# Altium PCB NewTrackerIRControl.PcbDoc (part 1 of 2)
Units mm, origin at the board's own origin, x right, y up, seen from the top; angles counter-clockwise.
Board outline 54 x 54 mm, 2 copper layers (Top Layer, Bottom Layer), stack 1.581 mm thick; 42 components, 15 nets, 94 pads, 126 vias.
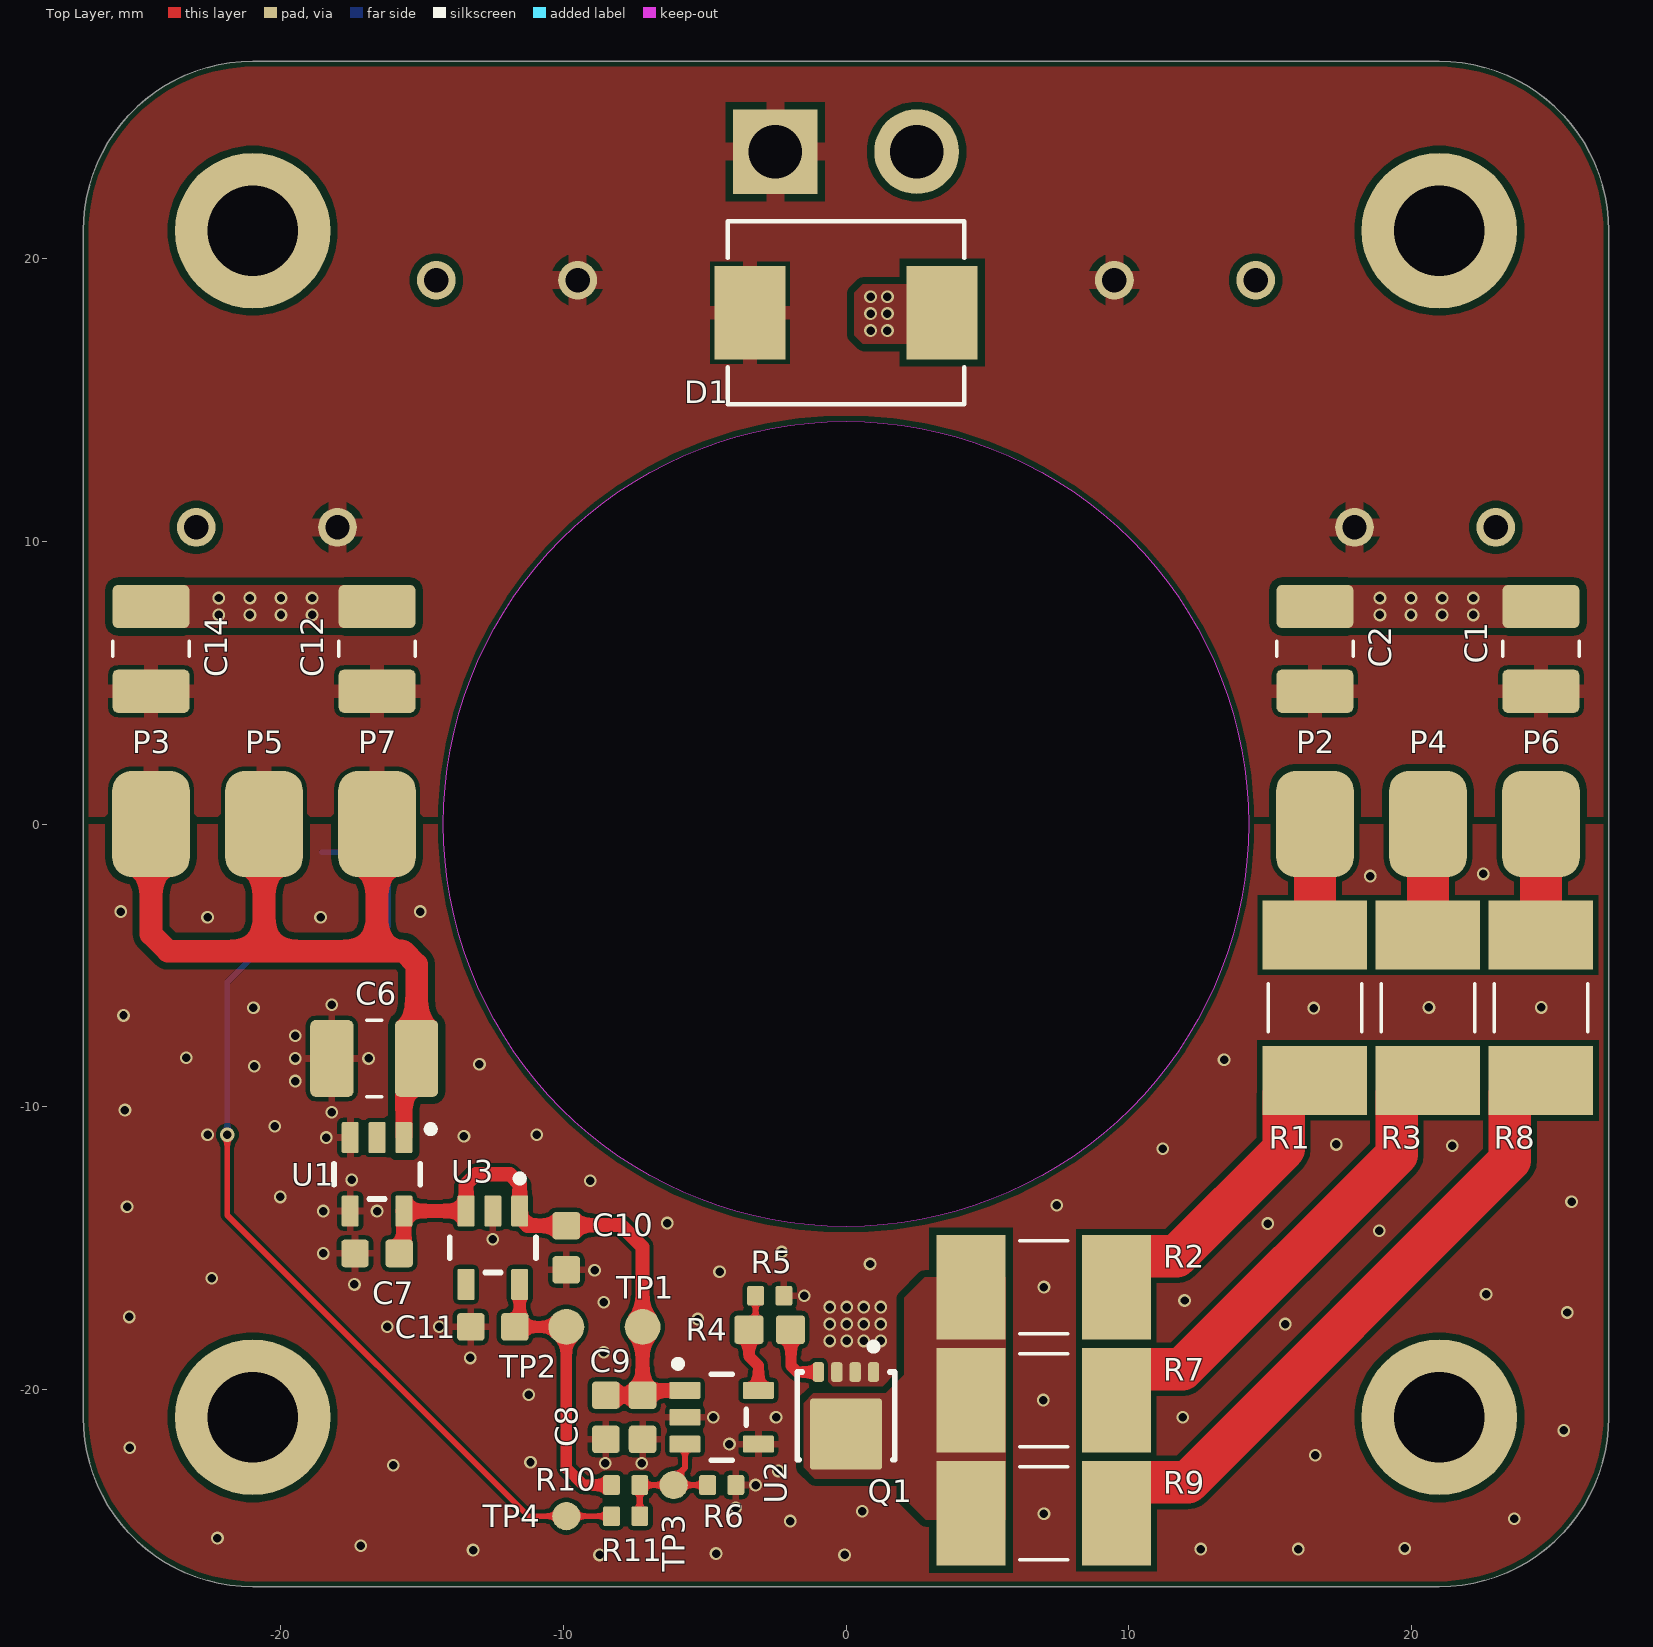
[diagram p0: Top Layer view]
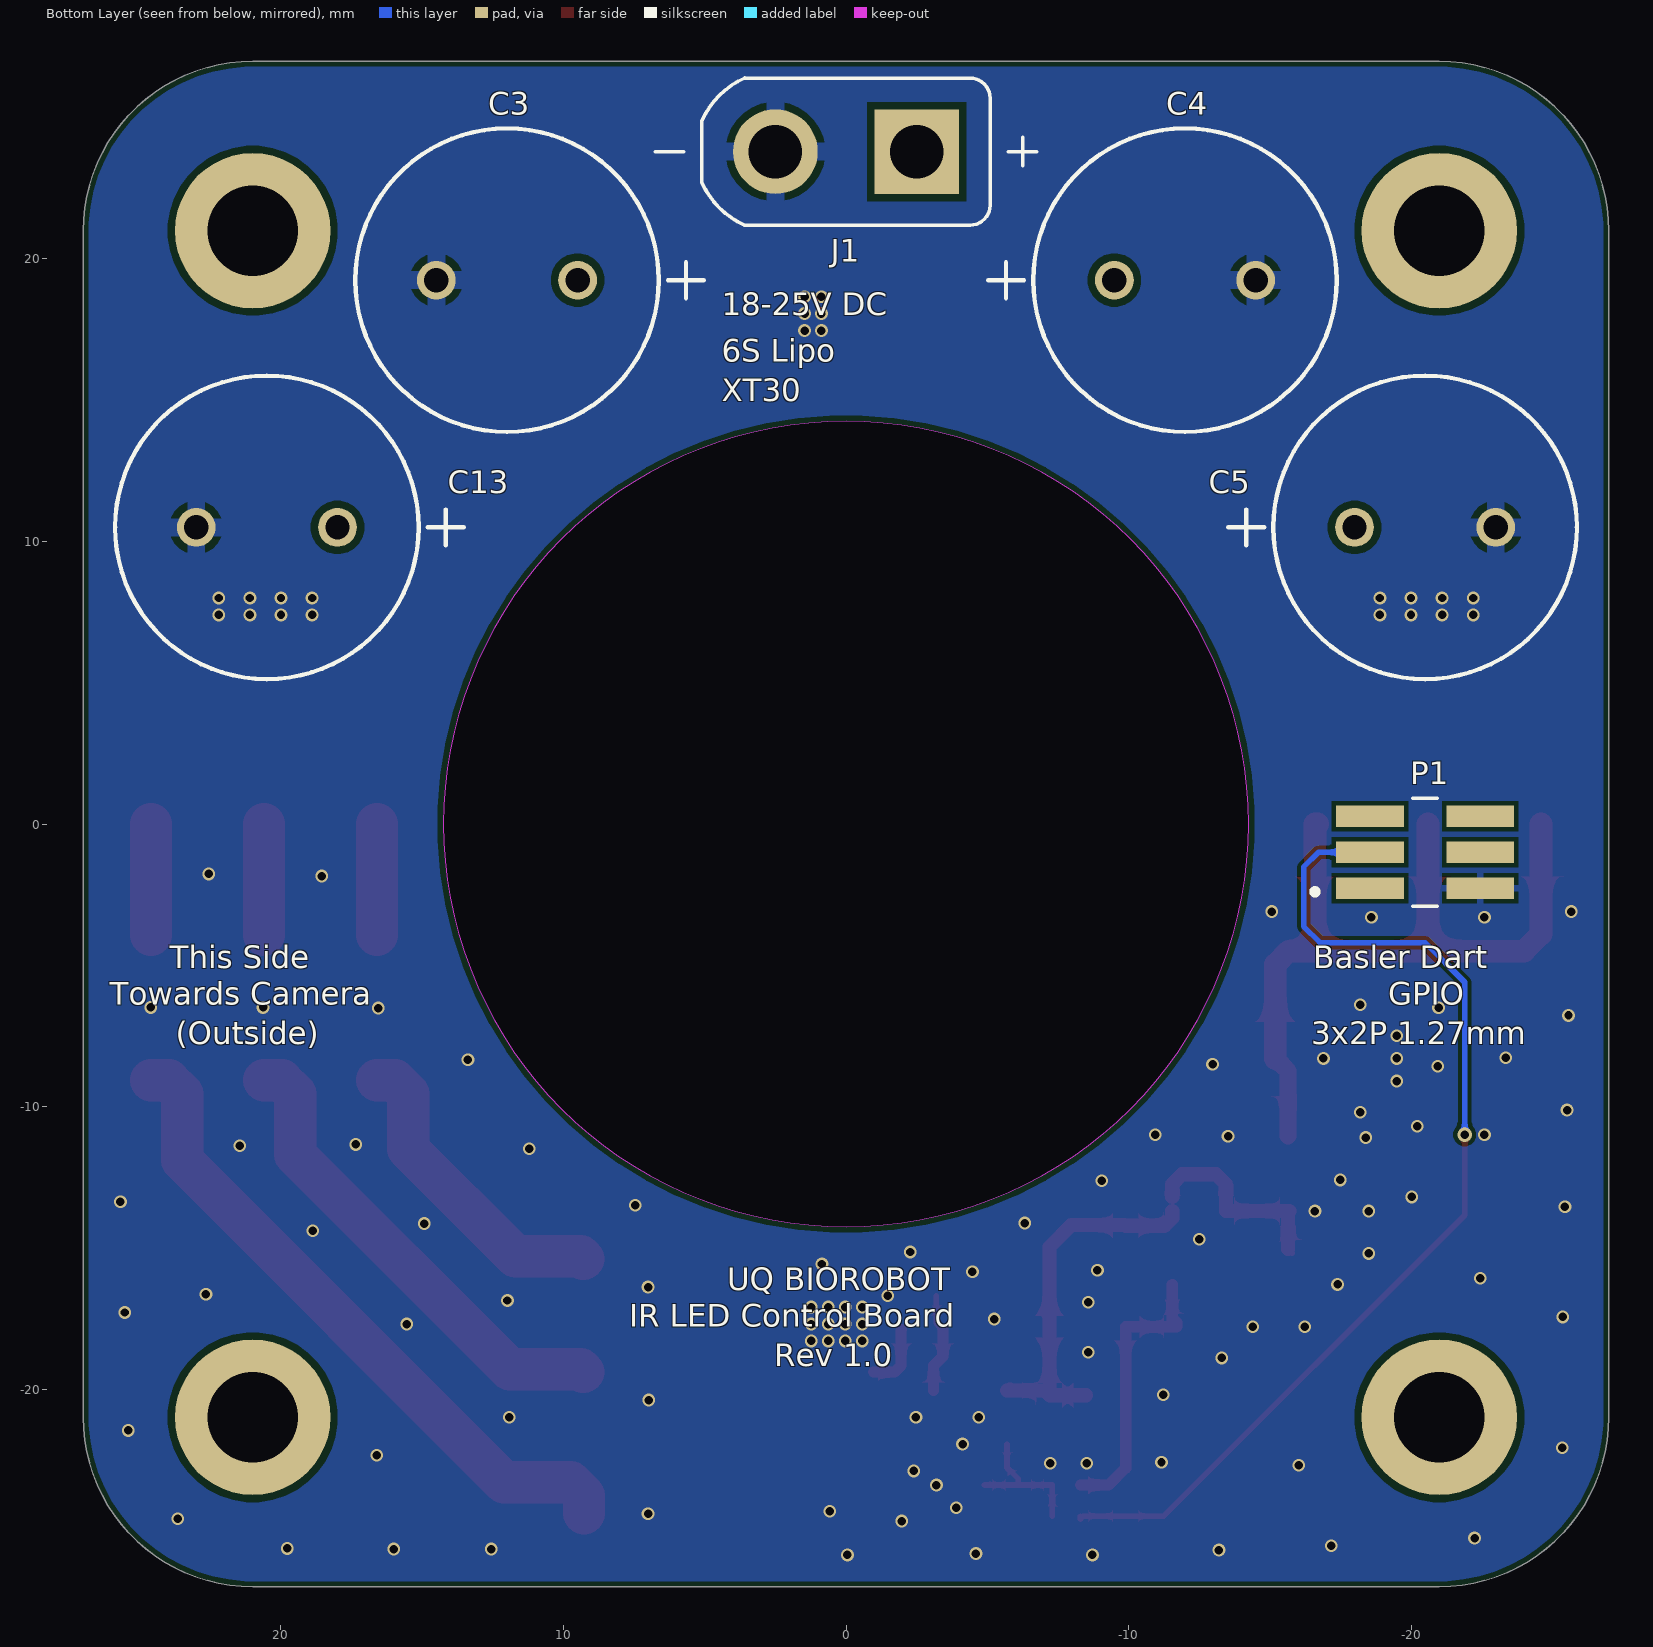
[diagram p1: Bottom Layer view, seen from below]
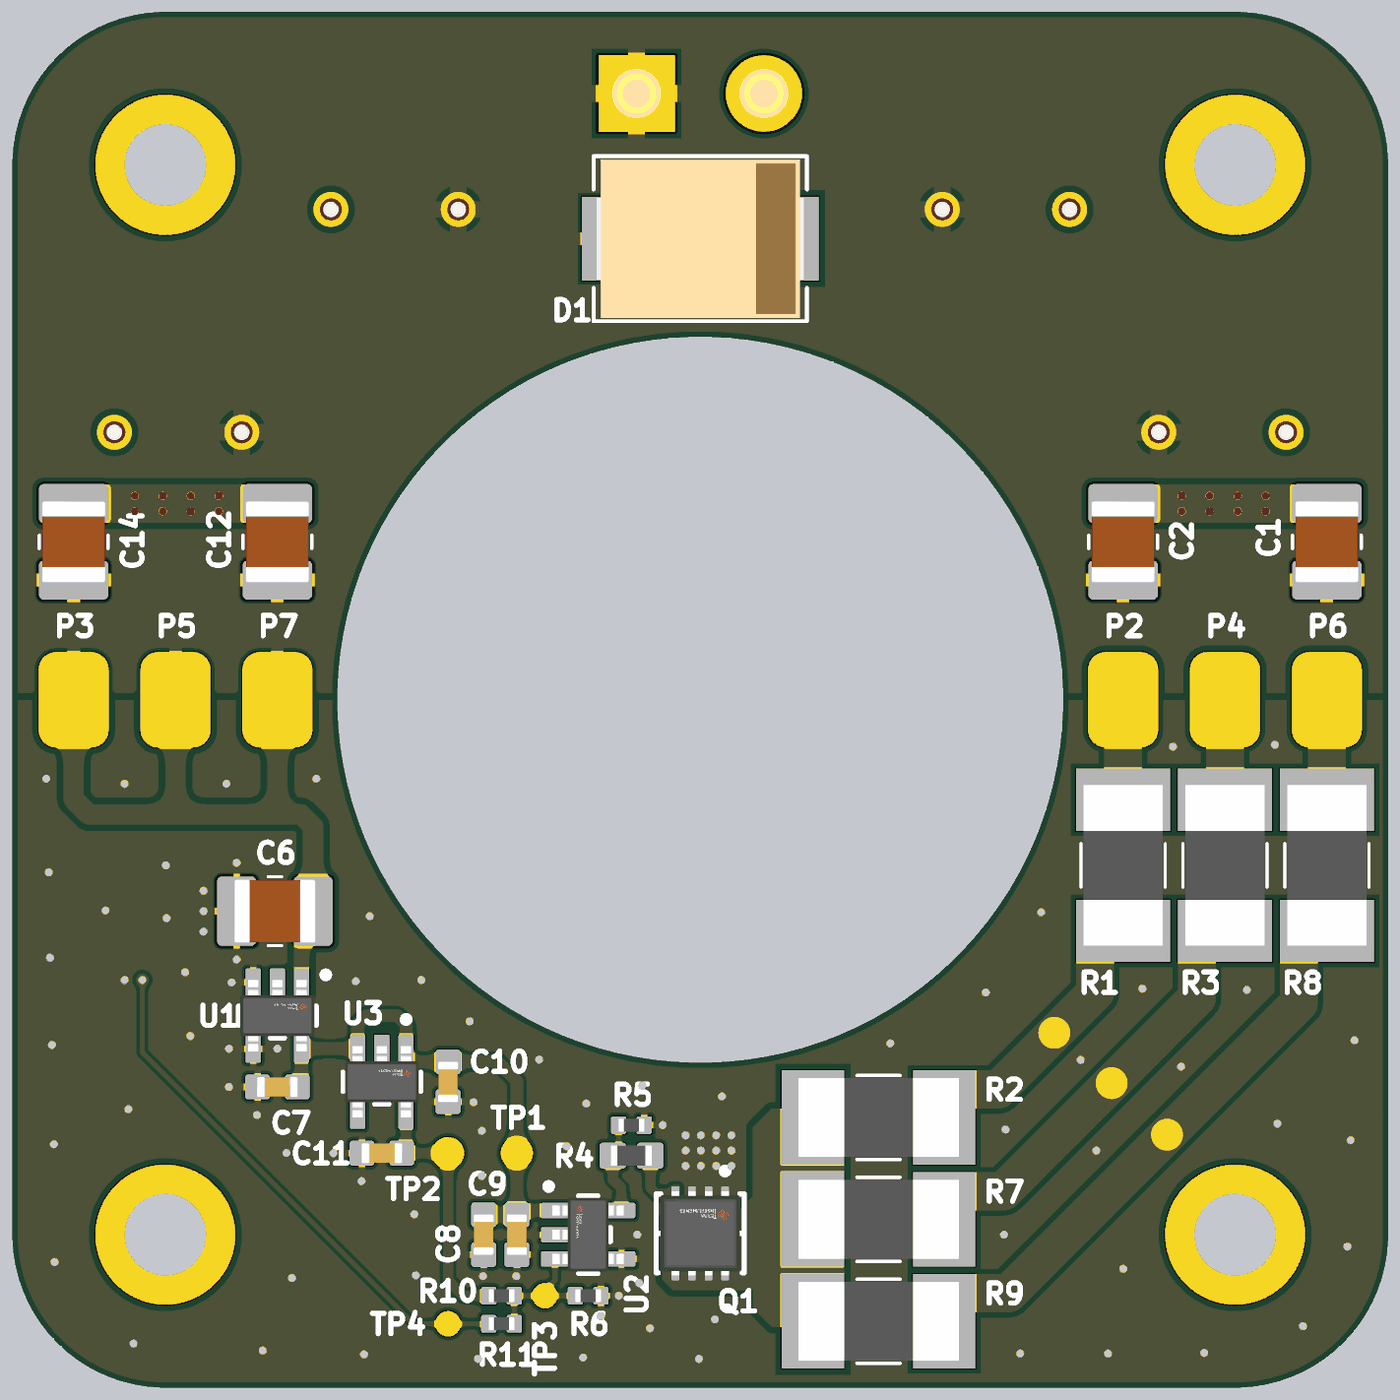
[diagram p2: 3D render of the assembled board from above, using the file's embedded part models]
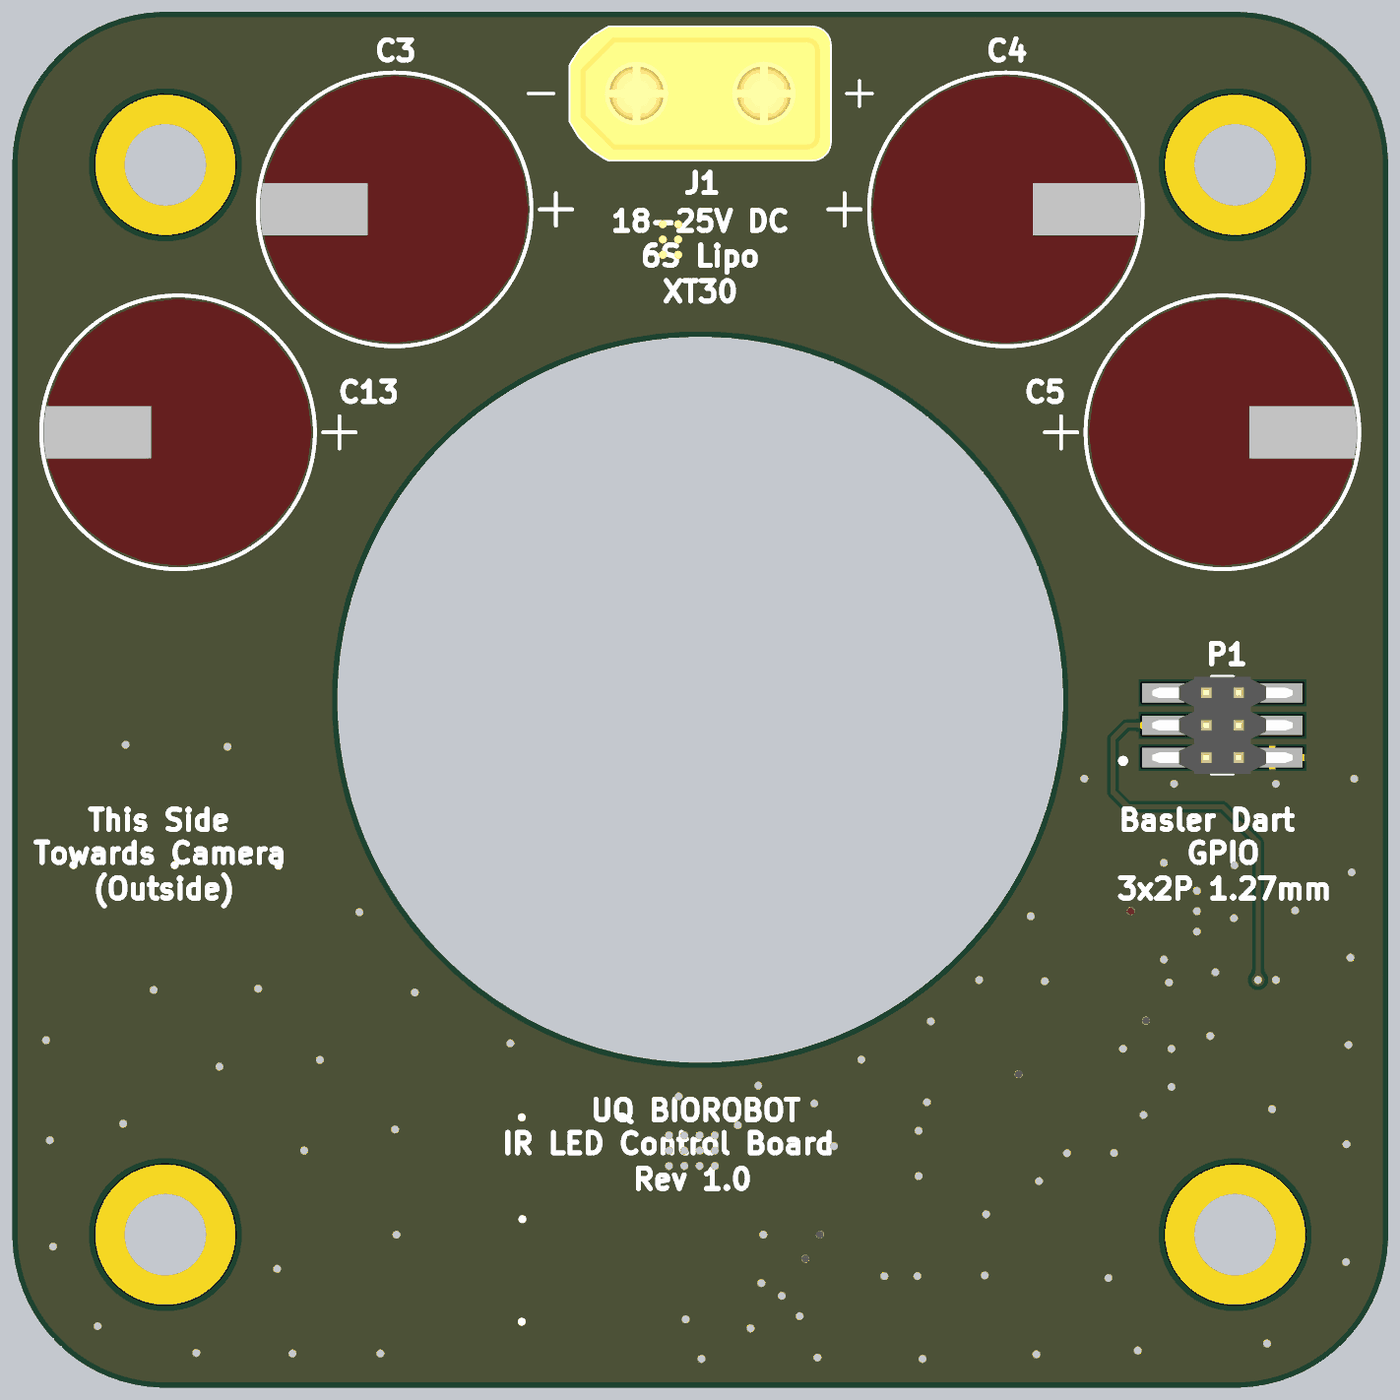
[diagram p3: 3D render of the assembled board from below, using the file's embedded part models]

## Layer stack, top to bottom
Top Solder: solder mask 0.0102, Solder Resist, Dk 3.5
Top Layer: signal copper 0.0356
Dielectric 1: dielectric 1.51, FR-4, Dk 4.8
Bottom Layer: signal copper 0.0356
Bottom Solder: solder mask 0.0102, Solder Resist, Dk 3.5

## Board outline
-27,-21 -27,21 cw(c-21,21) -21,27 21,27 cw(c21,21) 27,21 27,-21 cw(c21,-21) 21,-27 -21,-27 cw(c-21,-21)
cut-out: 0,-14.25 cw(c0,0) -14.25,0 cw(c0,0) 0,14.25 cw(c0,0) 14.25,0 cw(c0,0)

## Design rules (kind name [scope] priority, off if disabled: settings)
BoardOutlineClearance [All] p1: gap=0.2 ignorepadtopadclearanceinfootprint=FALSE
Clearance Clearance_7 [InNamedPolygon('TOPGND') vs (InNet('CHAINA') OR InNet('CHAINB') OR InNet('CHAINC') OR InNet('RES_A') OR InNet('RES_B') OR InNet('RES_C'))] p1: gap=0.254 ignorepadtopadclearanceinfootprint=FALSE except(0: Arc-Hole Track-Hole SMDPad-Hole THPad-Hole Via-Hole Fill-Hole Poly-Hole Region-Hole Text-Hole; 0.2: Arc-Fill Arc-Poly Arc-Region Track-Fill Track-Poly Track-Region SMDPad-Fill SMDPad-Poly SMDPad-Region THPad-Fill THPad-Poly THPad-Region Via-Fill Via-Poly Via-Region Fill-Fill Fill-Poly Fill-Region Poly-Poly Poly-Region Region-Region)
Clearance Clearance_6 [InNamedPolygon('14') vs (InNet('CHAINA') OR InNet('CHAINB') OR InNet('CHAINC'))] p2: gap=0.254 ignorepadtopadclearanceinfootprint=FALSE except(0: Arc-Hole Track-Hole SMDPad-Hole THPad-Hole Via-Hole Fill-Hole Poly-Hole Region-Hole Text-Hole)
Clearance Clearance_5 [InNamedPolygon('TOPGND') vs (InNet('DRAIN') OR InNet('+VBAT'))] p3: gap=0.254 ignorepadtopadclearanceinfootprint=FALSE except(0: Arc-Hole Track-Hole SMDPad-Hole THPad-Hole Via-Hole Fill-Hole Poly-Hole Region-Hole Text-Hole)
Clearance Clearance_4 [InNamedPolygon('TOPGND2')] p4: gap=0.254 ignorepadtopadclearanceinfootprint=FALSE except(0: Arc-Hole Track-Hole SMDPad-Hole THPad-Hole Via-Hole Fill-Hole Poly-Hole Region-Hole Text-Hole)
Clearance Clearance_3 [(InNamedPolygon('8') OR InNamedPolygon('9') OR InNamedPolygon('10') OR InNamedPolygon('11') OR InNamedPolygon('12') OR InNamedPolygon('13')) vs InNet('GND')] p5: gap=0.254 ignorepadtopadclearanceinfootprint=FALSE except(0: Arc-Hole Track-Hole SMDPad-Hole THPad-Hole Via-Hole Fill-Hole Poly-Hole Region-Hole Text-Hole)
Clearance Clearance_2 [InNamedPolygon('15') vs (InNet('+VBAT') or InNet('DRAIN'))] p6: gap=0.254 ignorepadtopadclearanceinfootprint=FALSE except(0: Arc-Hole Track-Hole SMDPad-Hole THPad-Hole Via-Hole Fill-Hole Poly-Hole Region-Hole Text-Hole)
Clearance Clearance_1 [InNamedPolygon('14') vs InNet('GND')] p7: gap=0.254 ignorepadtopadclearanceinfootprint=FALSE except(0: Arc-Hole Track-Hole SMDPad-Hole THPad-Hole Via-Hole Fill-Hole Poly-Hole Region-Hole Text-Hole)
Clearance [All] p8: gap=0.15 ignorepadtopadclearanceinfootprint=FALSE except(0.102: Arc-Text Track-Text SMDPad-Text THPad-Text Fill-Text Poly-Text Region-Text Text-Text; 0.12: Arc-Arc Arc-Track Track-Track; 0.127: Arc-Fill Arc-Poly Arc-Region Track-Fill Track-Poly Track-Region SMDPad-Via THPad-Via Via-Via Via-Fill Via-Poly Via-Region Via-Text; 0.2: Arc-THPad Track-THPad; 0.25: Arc-Hole Track-Hole SMDPad-Hole THPad-Fill THPad-Poly THPad-Region THPad-Hole Via-Hole Fill-Hole Poly-Hole Region-Hole Text-Hole)
DiffPairsRouting [InDifferentialPairClass('USBCONN_DIFF')] p1: maxlimit=0.127 minlimit=0.127 mostfreqgap=0.127 toplayer_minwidth=0.2 toplayer_maxwidth=0.2 toplayer_prefwidth=0.2 bottomlayer_minwidth=0.2 bottomlayer_maxwidth=0.2 bottomlayer_prefwidth=0.2 impedanceprofiledriven=TRUE maxuncoupledlength=12.7
HoleSize [All] p1: absolutevalues=TRUE maxlimit=6.3 minlimit=0.2 maxpercent=80.000 minpercent=20.000
HoleToHoleClearance [All] p1: gap=0.25 allowstackedmicrovias=FALSE
MinimumAnnularRing [All] p1: minimumring=0.074
MinimumSolderMaskSliver [All] p1: minsoldermaskwidth=0.1
PlaneClearance [All] p1: clearance=0.15
PolygonConnect PolygonConnect_16 [All vs IsNamedPolygon('TOPGND2')] p1: connectstyle=Direct reliefconductorwidth=0.254 reliefentries=4 polygonreliefangle="90 Angle" airgapwidth=0.254
PolygonConnect PolygonConnect_15 [All vs IsNamedPolygon('9')] p2: connectstyle=Direct reliefconductorwidth=0.254 reliefentries=4 polygonreliefangle="90 Angle" airgapwidth=0.254
PolygonConnect PolygonConnect_14 [All vs IsNamedPolygon('8')] p3: connectstyle=Direct reliefconductorwidth=0.254 reliefentries=4 polygonreliefangle="90 Angle" airgapwidth=0.254
PolygonConnect PolygonConnect_13 [All vs IsNamedPolygon('10')] p4: connectstyle=Direct reliefconductorwidth=0.254 reliefentries=4 polygonreliefangle="90 Angle" airgapwidth=0.254
PolygonConnect PolygonConnect_12 [All vs IsNamedPolygon('11')] p5: connectstyle=Direct reliefconductorwidth=0.254 reliefentries=4 polygonreliefangle="90 Angle" airgapwidth=0.254
PolygonConnect PolygonConnect_11 [All vs IsNamedPolygon('12')] p6: connectstyle=Direct reliefconductorwidth=0.254 reliefentries=4 polygonreliefangle="90 Angle" airgapwidth=0.254
PolygonConnect PolygonConnect_10 [All vs IsNamedPolygon('13')] p7: connectstyle=Direct reliefconductorwidth=0.254 reliefentries=4 polygonreliefangle="90 Angle" airgapwidth=0.254
PolygonConnect PolygonConnect_9 [All vs IsNamedPolygon('7')] p8: connectstyle=Direct reliefconductorwidth=0.254 reliefentries=4 polygonreliefangle="90 Angle" airgapwidth=0.254
PolygonConnect PolygonConnect_8 [All vs IsNamedPolygon('14')] p9: thpad.connectstyle=Relief thpad.reliefconductorwidth=0.65 thpad.reliefentries=4 thpad.polygonreliefangle="90 Angle" thpad.airgapwidth=0.254 smdpad.connectstyle=Relief smdpad.reliefconductorwidth=0.5 smdpad.reliefentries=4 smdpad.polygonreliefangle="90 Angle" smdpad.airgapwidth=0.154 via.connectstyle=Direct via.reliefconductorwidth=0.254 via.reliefentries=4 via.polygonreliefangle="90 Angle" via.airgapwidth=0.254
PolygonConnect PolygonConnect_1 [All vs IsNamedPolygon('TOPGND')] p10: thpad.connectstyle=Direct thpad.reliefconductorwidth=0.254 thpad.reliefentries=4 thpad.polygonreliefangle="90 Angle" thpad.airgapwidth=0.254 smdpad.connectstyle=Relief smdpad.reliefconductorwidth=0.254 smdpad.reliefentries=4 smdpad.polygonreliefangle="90 Angle" smdpad.airgapwidth=0.15 via.connectstyle=Direct via.reliefconductorwidth=0.254 via.reliefentries=4 via.polygonreliefangle="90 Angle" via.airgapwidth=0.254
PolygonConnect PolygonConnect_3 [All vs IsNamedPolygon('PADEE')] p11: connectstyle=Direct reliefconductorwidth=0.254 reliefentries=4 polygonreliefangle="90 Angle" airgapwidth=0.254
PolygonConnect PolygonConnect_7 [All vs IsNamedPolygon('4')] p12: connectstyle=Direct reliefconductorwidth=0.254 reliefentries=4 polygonreliefangle="90 Angle" airgapwidth=0.254
PolygonConnect PolygonConnect_6 [All vs IsNamedPolygon('3')] p13: connectstyle=Direct reliefconductorwidth=0.254 reliefentries=4 polygonreliefangle="90 Angle" airgapwidth=0.254
PolygonConnect PolygonConnect_5 [All vs IsNamedPolygon('2')] p14: connectstyle=Direct reliefconductorwidth=0.254 reliefentries=4 polygonreliefangle="90 Angle" airgapwidth=0.254
PolygonConnect PolygonConnect_4 [All vs IsNamedPolygon('1')] p15: connectstyle=Direct reliefconductorwidth=0.254 reliefentries=4 polygonreliefangle="90 Angle" airgapwidth=0.254
PolygonConnect [InNet('GND') vs InNamedPolygon('PADEE')] p16: connectstyle=Direct reliefconductorwidth=0.254 reliefentries=4 polygonreliefangle="90 Angle" airgapwidth=0.254
PolygonConnect PolygonConnect_2 [All] p17: thpad.connectstyle=Relief thpad.reliefconductorwidth=0.65 thpad.reliefentries=4 thpad.polygonreliefangle="90 Angle" thpad.airgapwidth=0.254 smdpad.connectstyle=Relief smdpad.reliefconductorwidth=0.254 smdpad.reliefentries=4 smdpad.polygonreliefangle="90 Angle" smdpad.airgapwidth=0.15 via.connectstyle=Direct via.reliefconductorwidth=0.254 via.reliefentries=4 via.polygonreliefangle="90 Angle" via.airgapwidth=0.254
RoutingVias [All] p1: holewidth=0.2 width=0.45 viastyle="Through Hole" minholewidth=0.2 minwidth=0.45 maxholewidth=0.2 maxwidth=0.45
SilkToSilkClearance [All] p1: silktosilkclearance=0
SilkToSolderMaskClearance [IsPad] p1: minsilkscreentomaskgap=0.102 clearancetoexposedcopper=TRUE
SolderMaskExpansion SolderMaskExpansion_1 [IsVia] p1: expansion=0.102 istentingtop=TRUE
SolderMaskExpansion [All] p2: expansion=0.075 istentingtop=FALSE
Width [All] p1: maxlimit=1.5 minlimit=0.102 preferedwidth=0.2 bottomlayer_maxwidth=0.8 minimp=50.000000 maximp=50.000000 favimp=50.000000
23 further rules are at their usual default settings.

## Components (designator, comment, footprint, x,y, rotation, side; value= is the part's Value field where it differs from the comment)
C1 "10uF" 1210_CAP 24.6,6.2 r270 top
C2 "10uF" 1210_CAP 16.6,6.2 r270 top
C3 "330uF" CAP_PKPZ_10X16_LOW_RUB 9.5,19.25 r0 bottom
C4 "330uF" CAP_PKPZ_10X16_LOW_RUB -9.5,19.25 r180 bottom
C5 "330uF" CAP_PKPZ_10X16_LOW_RUB -18,10.5 r180 bottom
C6 "10uF" 1210_CAP -16.7,-8.3 r0 top
C7 "10uF" 0603_CAP -16.6,-15.2 r0 top
C8 "10uF" 0603_CAP -8.5,-21 r90 top
C9 "100nF" 0603_CAP -7.2,-21 r90 top
C10 "1uF" 0603_CAP -9.9,-15 r90 top
C11 "2.2µF" 0603_CAP -12.5,-17.8 r0 top
C12 "10uF" 1210_CAP -16.6,6.2 r270 top
C13 "330uF" CAP_PKPZ_10X16_LOW_RUB 18,10.5 r0 bottom
C14 "10uF" 1210_CAP -24.6,6.2 r270 top
D1 "SMCJ26CA" SMCJSERIES_LTF-M 0,18.1 r180 top
J1 "XT30UPB-M" AMASS_XT30UPB-M 0,23.8 r0 bottom
P1 "6P 1.27mm Pitch Header" AMPHENOL_20021121-00006T4LF -20.5,-1 r270 bottom
P2 "3x2.5mm SOLDER_PAD" SOLDER_PAD_SMD 16.6,0 r0 top
P3 "3x2.5mm SMD_SOLDER_PAD" SOLDER_PAD_SMD -24.6,0 r180 top
P4 "3x2.5mm SOLDER_PAD" SOLDER_PAD_SMD 20.6,0 r0 top
P5 "3x2.5mm SMD_SOLDER_PAD" SOLDER_PAD_SMD -20.6,0 r180 top
P6 "3x2.5mm SOLDER_PAD" SOLDER_PAD_SMD 24.6,0 r0 top
P7 "3x2.5mm SMD_SOLDER_PAD" SOLDER_PAD_SMD -16.6,0 r180 top
Q1 "CSD18543Q3AT" FP-DNH0008A-MFG 0,-20.95 r270 top
R1 "1Ω" 2512_RES 16.6,-6.5 r270 top
R2 "0Ω" 2512_RES 7,-16.4 r0 top
R3 "1Ω" 2512_RES 20.6,-6.5 r270 top
R4 "10Ω" 0603_RES -2.7,-17.9 r0 top
R5 "10K" 0402_RES -2.7,-16.7 r180 top
R6 "100K" 0402_RES -4.4,-23.4 r180 top
R7 "0Ω" 2512_RES 7,-20.4 r0 top
R8 "1Ω" 2512_RES 24.6,-6.5 r270 top
R9 "0Ω" 2512_RES 7,-24.4 r0 top
R10 "0R" 0402_RES -7.8,-23.4 r0 top
R11 "0R" 0402_RES -7.8,-24.5 r0 top
TP1 "50mil TEST_PAD" 15mil_TEST_PAD -7.2,-17.8 r0 top
TP2 "50mil TEST_PAD" 15mil_TEST_PAD -9.9,-17.8 r0 top
TP3 "1mm TEST_PAD" 1mm_TEST_PAD -6.1,-23.4 r90 top
TP4 "1mm TEST_PAD" 1mm_TEST_PAD -9.9,-24.5 r90 top
U1 "TPS7B6950QDBVRQ1" FP-DBV0005A-MFG -16.6,-12.4 r270 top
U2 "UCC27517DBVR" FP-DBV0005A-MFG -4.4,-21 r0 top
U3 "TPS7A2033PDBVR" FP-DBV0005A-MFG -12.5,-15 r270 top

## Footprints (in the part's own frame and the unit in brackets; to place one, negate y for a bottom-side part, rotate by r counter-clockwise, add the part's x,y. Pads: shape width x height; smd on the part's side, far side on the other; paste and mask are expansions set on the pad)
1mm_TEST_PAD [mm]
  round 1 smd paste-2539.97 mask+0.051: 1(0,0)
15mil_TEST_PAD [mm]
  round 1.27 smd paste-2539.97 mask+0.051: 1(0,0)
0402_RES [mm]
  rrect25% 0.6x0.7 smd paste+0 mask+0.051: 1(-0.5,0) 2(0.5,0)
  body extent -0.5,-0.25 0.5,0.25, height 0.4
0603_CAP [mm]
  rrect25% 0.972x0.981 smd mask+0.051: 1(-0.78,0) 2(0.78,0)
  body extent -0.8,-0.4 0.8,0.4, height 0.9
0603_RES [mm]
  rrect25% 1.04x1.02 smd mask+0.051: 1(-0.735,0) 2(0.735,0)
  body extent -0.8,-0.4 0.8,0.4, height 0.55
1210_CAP [mm]
  rrect25% 1.53x2.72 smd paste+0 mask+0.102: 1(-1.5,0) 2(1.5,0)
  silkscreen extent -0.26,-1.35 0.26,1.35, body extent -1.6,-1.25 1.6,1.25, height 2.7
2512_RES [mm]
  rect 2.45x3.7 smd mask+0.051: 1(-2.575,0) 2(2.575,0)
  silkscreen extent -0.85,-1.65 0.85,1.65, body extent -3.15,-1.55 3.15,1.55, height 0.8
AMASS_XT30UPB-M [mm]
  rect 3x3 hole 1.9 mask+0.102: 1(-2.5,0)
  round 3 hole 1.9 mask+0.102: 2(2.5,0)
  silkscreen extent -6.75,-2.61 6.75,2.61, body extent -5.1,-2.6 5.1,2.6, height 10.7
AMPHENOL_20021121-00006T4LF [mm]
  rect 0.76x2.4 smd: 1(1.27,-1.95) 2(1.27,1.95) 3(0,-1.95) 4(0,1.95) 5(-1.27,-1.95) 6(-1.27,1.95)
  silkscreen extent -1.91,-4 1.91,0.43, body extent -1.91,-2.75 1.91,2.75, height 4.55
CAP_PKPZ_10X16_LOW_RUB [mil]
  round 54 hole 34 paste-27 mask+0: 1(0,0) 2(196.85,0)
  silkscreen extent -176,-212 310,212, body extent -108,-206 306,206, height 690
FP-DBV0005A-MFG [mm]
  rrect17% 1.1x0.6 smd paste+0 mask+0.051: 1(-1.3,0.95) 2(-1.3,0) 3(-1.3,-0.95) 4(1.3,-0.95) 5(1.3,0.95)
  silkscreen extent -1.72,-1.53 0.87,2.02, body extent -1.95,-1.78 1.95,1.78, height 0.25
FP-DNH0008A-MFG [mm]
  rrect50% 0.7x0.4 smd paste-1000 mask-1000: 1(-1.55,0.975) 2(-1.55,0.325) 3(-1.55,-0.325) 4(-1.55,-0.975)
  rrect8% 2.51x2.55 smd paste-1000 mask-1000: 5-6-7-8(0.645,0)
  silkscreen extent -2.57,-1.73 1.55,1.73, body extent -2,-1.88 2,1.88, height 0.25
SMCJSERIES_LTF-M [mm]
  rect 2.5x3.3 smd paste+0 mask+0.051: 1(-3.4,0) 2(3.4,0)
  silkscreen extent -4.19,-3.24 4.19,3.24, body extent -4.06,-3.11 4.06,3.11, height 2.67
SOLDER_PAD_SMD [mm]
  rrect50% 2.75x3.75 smd paste-100 mask+0.051: 1(0,0)

## Part data
C1 C2 C6 C12 C14: library part GCM32EC71H106KA03L, "50V 10uF X7S ±10% 1210 Multilayer Ceramic Capacitors MLCC - SMD/SMT ROHS", Capacitance=10µF, Case Code (Imperial)=1210, Case Code (Metric)=3225, Dielectric=X7S, Dielectric Material=Ceramic, Manufacturer=Murata, Manufacturer Lifecycle Status="IN PRODUCTION", Manufacturer Package Identifier="1210 (3225 Metric)", Max Operating Temperature=125°C, Min Operating Temperature=-55°C, Ratings=AEC-Q200, Supplier Part Number 1=490-14536-1-ND, Tolerance=±10%, Voltage Rating=50V, Case/Package=1210, Category="Ceramic Capacitors", ComponentLink1Description=https://datasheet.octopart.com:443/GCM32EC71H106KA03L-Murata-datasheet-96711494.pdf?src-supplier=element14+APAC, ComponentLink1URL=https://datasheet.octopart.com:443/GCM32EC71H106KA03L-Murata-datasheet-96711494.pdf?src-supplier=element14+APAC, ComponentLink2Description=https://datasheet.octopart.com:443/GCM32EC71H106KA03L-Murata-datasheet-141269272.pdf?src-supplier=Ciiva, ComponentLink2URL=https://datasheet.octopart.com:443/GCM32EC71H106KA03L-Murata-datasheet-141269272.pdf?src-supplier=Ciiva, ComponentLink3Description=https://datasheet.octopart.com:443/GCM32EC71H106KA03L-Murata-datasheet-140661459.pdf?src-supplier=Ciiva, ComponentLink3URL=https://datasheet.octopart.com:443/GCM32EC71H106KA03L-Murata-datasheet-140661459.pdf?src-supplier=Ciiva, ComponentLink4Description=https://datasheet.octopart.com:443/GCM32EC71H106KA03L-Murata-datasheet-138720471.pdf?src-supplier=Ciiva, ComponentLink4URL=https://datasheet.octopart.com:443/GCM32EC71H106KA03L-Murata-datasheet-138720471.pdf?src-supplier=Ciiva, ComponentLink5Description=https://datasheet.octopart.com:443/GCM32EC71H106KA03L-Murata-datasheet-12511495.pdf?src-supplier=TME, ComponentLink5URL=https://datasheet.octopart.com:443/GCM32EC71H106KA03L-Murata-datasheet-12511495.pdf?src-supplier=TME, ComponentLink6Description=http://sigma.octopart.com:80/reach_statement/Murata-company-16.pdf?src-supplier=Compliance+Statements, ComponentLink6URL=http://sigma.octopart.com:80/reach_statement/Murata-company-16.pdf?src-supplier=Compliance+Statements, Country of Origin="Japan, Philippines", Depth=2.5mm, Export Control Classification Number (ECCN) Code=EAR99, Harmonized Tariff Schedule (HTS) Code=8532.24.00.20, Height=2.5mm, Introduction Date=2013-11-20, Length=3.2mm, Lifecycle Status=Production, Manufacturer Part Number=GCM32EC71H106KA03L, Material=Ceramic, Mount="Surface Mount", Number of Terminals=2, Pricing 1="1=0.9, 10=0.569, 50=0.4396, 100=0.3997, 500=0.33218 (USD)", REACH SVHC=Yes, RoHS=Compliant, Schedule B="8532240020, 8532240020|8532240020, 8532240020|8532240020|8532240020, 8532240020|8532240020|8532240020|8532240020", Stock 1=65390, Supplier 1=DigiKey, Termination=SMD/SMT, Voltage Rating (DC)=50V, Weight=109.99615mg, Width=2.5mm
C3 C4 C5 C13: library part 50ZLJ330M10X16, "330uF 50V ±20% Plugin, D10xL16mm Aluminum Electrolytic Capacitors - Leaded ROHS", Capacitance=330µF, Case/Package=Radial, Leakage Current=165µA, Manufacturer=Rubycon, Max Operating Temperature=105°C, Min Operating Temperature=-40°C, Ripple Current=1.155A, Supplier Part Number 1=1189-50ZLJ330M10X16-ND, Tolerance=±20%, Voltage Rating (DC)=50V, Category="Aluminum Electrolytic Capacitors", ComponentLink1Description=https://datasheet.octopart.com:443/50ZLJ330M10X16-Rubycon-datasheet-182101256.pdf?src-supplier=IHS, ComponentLink1URL=https://datasheet.octopart.com:443/50ZLJ330M10X16-Rubycon-datasheet-182101256.pdf?src-supplier=IHS, Diameter=10mm, Length=16mm, Lifecycle Status=Production, Manufacturer Part Number=50ZLJ330M10X16, Mount="Through Hole", Number of Terminals=2, Packaging=Bulk, Pricing 1="1=0.92, 10=0.578, 50=0.4358, 100=0.3908, 500=0.31312, 1000=0.28861, 3000=0.25797, 5000=0.24651 (USD)", REACH SVHC=Yes, RoHS=Compliant, Stock 1=990, Supplier 1=DigiKey, Terminal Pitch=5mm
C7 C8: library part GRM188R61E106KA73J, "25V 10uF X7R ±10% 0603 Multilayer Ceramic Capacitors MLCC - SMD/SMT ROHS", Capacitance=10µF, Case/Package=0603, Dielectric=X5R, Dielectric Material=Ceramic, Manufacturer=Murata, Manufacturer Lifecycle Status="IN PRODUCTION", Max Operating Temperature=85°C, Min Operating Temperature=-55°C, Supplier Part Number 1=490-GRM188R61E106KA73JCT-ND, Tolerance=±10%, Voltage Rating=25V, Category="Ceramic Capacitors", ComponentLink1Description=https://datasheet.octopart.com:443/GRM188R61E106KA73J-Murata-datasheet-165579666.pdf?src-supplier=TME, ComponentLink1URL=https://datasheet.octopart.com:443/GRM188R61E106KA73J-Murata-datasheet-165579666.pdf?src-supplier=TME, ComponentLink2Description=https://datasheet.octopart.com:443/GRM188R61E106KA73J-Murata-datasheet-141274968.pdf?src-supplier=Ciiva, ComponentLink2URL=https://datasheet.octopart.com:443/GRM188R61E106KA73J-Murata-datasheet-141274968.pdf?src-supplier=Ciiva, ComponentLink3Description=https://datasheet.octopart.com:443/GRM188R61E106KA73J-Murata-datasheet-140704821.pdf?src-supplier=Ciiva, ComponentLink3URL=https://datasheet.octopart.com:443/GRM188R61E106KA73J-Murata-datasheet-140704821.pdf?src-supplier=Ciiva, ComponentLink4Description=https://datasheet.octopart.com:443/GRM188R61E106KA73J-Murata-datasheet-138742889.pdf?src-supplier=Ciiva, ComponentLink4URL=https://datasheet.octopart.com:443/GRM188R61E106KA73J-Murata-datasheet-138742889.pdf?src-supplier=Ciiva, ComponentLink5Description=https://datasheet.octopart.com/GRM188R61E106KA73J-Murata-datasheet-12515295.pdf, ComponentLink5URL=https://datasheet.octopart.com/GRM188R61E106KA73J-Murata-datasheet-12515295.pdf, ComponentLink6Description=https://datasheet.octopart.com/GRM188R61E106KA73J-Murata-datasheet-12510076.pdf, ComponentLink6URL=https://datasheet.octopart.com/GRM188R61E106KA73J-Murata-datasheet-12510076.pdf, ComponentLink7Description=https://datasheet.octopart.com/GRM188R61E106KA73J-Murata-datasheet-11978611.pdf, ComponentLink7URL=https://datasheet.octopart.com/GRM188R61E106KA73J-Murata-datasheet-11978611.pdf, ComponentLink8Description=https://datasheet.octopart.com/GRM188R61E106KA73J-Murata-datasheet-10025737.pdf, ComponentLink8URL=https://datasheet.octopart.com/GRM188R61E106KA73J-Murata-datasheet-10025737.pdf, ComponentLink9Description=https://datasheet.octopart.com/GRM188R61E106KA73J-Murata-datasheet-8819587.pdf, ComponentLink9URL=https://datasheet.octopart.com/GRM188R61E106KA73J-Murata-datasheet-8819587.pdf, ComponentLink10Description=http://sigma.octopart.com:80/reach_statement/Murata-company-16.pdf?src-supplier=Compliance+Statements, ComponentLink10URL=http://sigma.octopart.com:80/reach_statement/Murata-company-16.pdf?src-supplier=Compliance+Statements, Height=800µm, Length=1.6mm, Lifecycle Status=Production, Manufacturer Part Number=GRM188R61E106KA73J, Material=Ceramic, Mount="Surface Mount", Number of Terminals=2, Pricing 1="1=0.26, 10=0.149, 50=0.1072, 100=0.0945, 500=0.07304, 1000=0.06643, 2500=0.05947, 5000=0.05528 (USD)", REACH SVHC=Yes, RoHS=Compliant, Stock 1=170211, Supplier 1=DigiKey, Thickness=800µm, Voltage Rating (DC)=25V, Width=800µm
C9: library part GCJ188R71H104KA12D, "50V 100nF X7R ±10% 0603 Multilayer Ceramic Capacitors MLCC - SMD/SMT ROHS", Case Code (Imperial)=0603, Case Code (Metric)=1608, Dielectric=X7R, Dielectric Material=Ceramic, Manufacturer=Murata, Manufacturer Lifecycle Status="IN PRODUCTION", Max Operating Temperature=125°C, Min Operating Temperature=-55°C, Ratings=AEC-Q200, Supplier Part Number 1=490-5798-1-ND, Tolerance=±10%, Voltage Rating=50V, Capacitance=100nF, Case/Package=0603, Category="Ceramic Capacitors", ComponentLink1Description=https://datasheet.octopart.com:443/GCJ188R71H104KA12D-Murata-datasheet-68586835.pdf?src-supplier=Newark, ComponentLink1URL=https://datasheet.octopart.com:443/GCJ188R71H104KA12D-Murata-datasheet-68586835.pdf?src-supplier=Newark, ComponentLink2Description=https://datasheet.octopart.com:443/GCJ188R71H104KA12D-Murata-datasheet-140654765.pdf?src-supplier=Ciiva, ComponentLink2URL=https://datasheet.octopart.com:443/GCJ188R71H104KA12D-Murata-datasheet-140654765.pdf?src-supplier=Ciiva, ComponentLink3Description=https://datasheet.octopart.com:443/GCJ188R71H104KA12D-Murata-datasheet-138714437.pdf?src-supplier=Ciiva, ComponentLink3URL=https://datasheet.octopart.com:443/GCJ188R71H104KA12D-Murata-datasheet-138714437.pdf?src-supplier=Ciiva, ComponentLink4Description=https://datasheet.octopart.com:443/GCJ188R71H104KA12D-Murata-datasheet-165611796.pdf?src-supplier=TME, ComponentLink4URL=https://datasheet.octopart.com:443/GCJ188R71H104KA12D-Murata-datasheet-165611796.pdf?src-supplier=TME, ComponentLink5Description=https://datasheet.octopart.com:443/GCJ188R71H104KA12D-Murata-datasheet-12524712.pdf?src-supplier=Future+Electronics, ComponentLink5URL=https://datasheet.octopart.com:443/GCJ188R71H104KA12D-Murata-datasheet-12524712.pdf?src-supplier=Future+Electronics, ComponentLink6Description=https://datasheet.octopart.com/GCJ188R71H104KA12D-Murata-datasheet-14405607.pdf, ComponentLink6URL=https://datasheet.octopart.com/GCJ188R71H104KA12D-Murata-datasheet-14405607.pdf, ComponentLink7Description=http://sigma.octopart.com:80/reach_statement/Murata-company-16.pdf?src-supplier=Compliance+Statements, ComponentLink7URL=http://sigma.octopart.com:80/reach_statement/Murata-company-16.pdf?src-supplier=Compliance+Statements, Country of Origin="Japan, Philippines", Depth=800µm, Export Control Classification Number (ECCN) Code=EAR99, Features="Soft Termination", Harmonized Tariff Schedule (HTS) Code=8532.24.00.20, Height=800µm, Introduction Date=2012-05-07, Lead Free="Lead Free", Length=1.6mm, Lifecycle Status=Production, Manufacturer Part Number=GCJ188R71H104KA12D, Material=Ceramic, Mount="Surface Mount", Number of Terminals=2, Packaging="Cut Tape", Pricing 1="1=0.13, 10=0.073, 50=0.0508, 100=0.044, 500=0.0327, 1000=0.02922 (USD)", Radiation Hardening=No, REACH SVHC=Yes, RoHS=Compliant, Schedule B="8532240020, 8532240020|8532240020, 8532240020|8532240020|8532240020, 8532240020|8532240020|8532240020|8532240020", Stock 1=938408, Supplier 1=DigiKey, Termination=SMD/SMT, Voltage Rating (DC)=50V, Width=800µm
C10: library part GCM188R71E105KA64D, "25V 1uF X7R ±10% 0603 Multilayer Ceramic Capacitors MLCC - SMD/SMT ROHS", Capacitance=1µF, Case Code (Imperial)=0603, Case Code (Metric)=1608, Dielectric=X7R, Dielectric Material=Ceramic, Manufacturer=Murata, Manufacturer Lifecycle Status="IN PRODUCTION", Max Operating Temperature=125°C, Min Operating Temperature=-55°C, Ratings=AEC-Q200, Supplier Part Number 1=490-10673-1-ND, Tolerance=±10%, Voltage=25V, Case/Package=0603, Category="Ceramic Capacitors", ComponentLink1Description=https://datasheet.octopart.com:443/GCM188R71E105KA64D-Murata-datasheet-39128443.pdf?src-supplier=Newark, ComponentLink1URL=https://datasheet.octopart.com:443/GCM188R71E105KA64D-Murata-datasheet-39128443.pdf?src-supplier=Newark, ComponentLink2Description=https://datasheet.octopart.com:443/GCM188R71E105KA64D-Murata-datasheet-62316951.pdf?src-supplier=element14+APAC, ComponentLink2URL=https://datasheet.octopart.com:443/GCM188R71E105KA64D-Murata-datasheet-62316951.pdf?src-supplier=element14+APAC, ComponentLink3Description=https://datasheet.octopart.com:443/GCM188R71E105KA64D-Murata-datasheet-141267554.pdf?src-supplier=Geoflip, ComponentLink3URL=https://datasheet.octopart.com:443/GCM188R71E105KA64D-Murata-datasheet-141267554.pdf?src-supplier=Geoflip, ComponentLink4Description=https://datasheet.octopart.com:443/GCM188R71E105KA64D-Murata-datasheet-140658666.pdf?src-supplier=Ciiva, ComponentLink4URL=https://datasheet.octopart.com:443/GCM188R71E105KA64D-Murata-datasheet-140658666.pdf?src-supplier=Ciiva, ComponentLink5Description=https://datasheet.octopart.com:443/GCM188R71E105KA64D-Murata-datasheet-138718232.pdf?src-supplier=Ciiva, ComponentLink5URL=https://datasheet.octopart.com:443/GCM188R71E105KA64D-Murata-datasheet-138718232.pdf?src-supplier=Ciiva, ComponentLink6Description=https://datasheet.octopart.com:443/GCM188R71E105KA64D-Murata-datasheet-81455541.pdf?src-supplier=TME, ComponentLink6URL=https://datasheet.octopart.com:443/GCM188R71E105KA64D-Murata-datasheet-81455541.pdf?src-supplier=TME, ComponentLink7Description=https://datasheet.octopart.com/GCM188R71E105KA64D-Murata-datasheet-14404430.pdf, ComponentLink7URL=https://datasheet.octopart.com/GCM188R71E105KA64D-Murata-datasheet-14404430.pdf, ComponentLink8Description=https://datasheet.octopart.com:443/GCM188R71E105KA64D-Murata-datasheet-14393380.pdf?src-supplier=Future+Electronics, ComponentLink8URL=https://datasheet.octopart.com:443/GCM188R71E105KA64D-Murata-datasheet-14393380.pdf?src-supplier=Future+Electronics, ComponentLink9Description=https://datasheet.octopart.com:443/GCM188R71E105KA64D-Murata-datasheet-44103482.pdf?src-supplier=Future+Electronics, ComponentLink9URL=https://datasheet.octopart.com:443/GCM188R71E105KA64D-Murata-datasheet-44103482.pdf?src-supplier=Future+Electronics, ComponentLink10Description=http://sigma.octopart.com:80/reach_statement/Murata-company-16.pdf?src-supplier=Compliance+Statements, ComponentLink10URL=http://sigma.octopart.com:80/reach_statement/Murata-company-16.pdf?src-supplier=Compliance+Statements, Country of Origin=Philippines, Depth=800µm, Export Control Classification Number (ECCN) Code=EAR99, Harmonized Tariff Schedule (HTS) Code=8532.24.00.20, Height=800µm, Introduction Date=2010-10-29, Lead Free="Lead Free", Length=1.6mm, Lifecycle Status=Production, Manufacturer Part Number=GCM188R71E105KA64D, Material=Ceramic, Mount="Surface Mount", Number of Terminals=2, Packaging="Cut Tape", Pricing 1="1=0.19, 10=0.106, 50=0.0752, 100=0.0658, 500=0.04994, 1000=0.04504 (USD)", Radiation Hardening=No, REACH SVHC=Yes, RoHS=Compliant, Schedule B="8532240020, 8532240020|8532240020, 8532240020|8532240020|8532240020, 8532240020|8532240020|8532240020|8532240020", Stock 1=751115, Supplier 1=DigiKey, Termination=SMD/SMT, Voltage Rating=25V, Voltage Rating (DC)=25V, Weight=6.293594mg, Width=800µm
C11: library part GRM188Z71E225KE43D, "25V 2.2uF X7R ±10% 0603 Multilayer Ceramic Capacitors MLCC - SMD/SMT ROHS", Case/Package=0603, Dielectric Material=X7R, Manufacturer=Murata, Manufacturer Lifecycle Status="IN PRODUCTION", Max Operating Temperature=125°C, Min Operating Temperature=-55°C, Supplier Part Number 1=490-GRM188Z71E225KE43DCT-ND, Tolerance=±10%, Voltage Rating=25V, Capacitance=2.2µF, Category="Ceramic Capacitors", ComponentLink1Description=https://datasheet.octopart.com:443/GRM188Z71E225KE43D-Murata-datasheet-141276026.pdf?src-supplier=Geoflip, ComponentLink1URL=https://datasheet.octopart.com:443/GRM188Z71E225KE43D-Murata-datasheet-141276026.pdf?src-supplier=Geoflip, ComponentLink2Description=https://datasheet.octopart.com:443/GRM188Z71E225KE43D-Murata-datasheet-165579666.pdf?src-supplier=TME, ComponentLink2URL=https://datasheet.octopart.com:443/GRM188Z71E225KE43D-Murata-datasheet-165579666.pdf?src-supplier=TME, ComponentLink3Description=https://datasheet.octopart.com:443/GRM188Z71E225KE43D-Murata-datasheet-140705919.pdf?src-supplier=Ciiva, ComponentLink3URL=https://datasheet.octopart.com:443/GRM188Z71E225KE43D-Murata-datasheet-140705919.pdf?src-supplier=Ciiva, ComponentLink4Description=https://datasheet.octopart.com:443/GRM188Z71E225KE43D-Murata-datasheet-138743437.pdf?src-supplier=Ciiva, ComponentLink4URL=https://datasheet.octopart.com:443/GRM188Z71E225KE43D-Murata-datasheet-138743437.pdf?src-supplier=Ciiva, ComponentLink5Description=http://sigma.octopart.com:80/reach_statement/Murata-company-16.pdf?src-supplier=Compliance+Statements, ComponentLink5URL=http://sigma.octopart.com:80/reach_statement/Murata-company-16.pdf?src-supplier=Compliance+Statements, Export Control Classification Number (ECCN) Code=EAR99, Harmonized Tariff Schedule (HTS) Code=8532.24.00.20, Height=800µm, Introduction Date=2017-02-21, Length=1.6mm, Lifecycle Status=Production, Manufacturer Part Number=GRM188Z71E225KE43D, Material=Ceramic, Mount="Surface Mount", Number of Terminals=2, Pricing 1="1=0.17, 10=0.096, 50=0.068, 100=0.0593, 500=0.04474, 1000=0.04026 (USD)", REACH SVHC=Yes, RoHS=Compliant, Stock 1=149124, Supplier 1=DigiKey, Thickness=800µm, Voltage Rating (DC)=25V, Width=800µm
D1: "SMCJ Series 42.1 V 1.5 kW Surface Mount Bi-Directional TVS Diode - DO-214AB", Breakdown Voltage=30.4V, Clamping Voltage=42.1V, Leakage Current=1µA, Manufacturer=Littelfuse, Max Breakdown Voltage=31.9V, Max Operating Temperature=150°C, Max Power Dissipation=6.5W, Max Surge Current=35.7A, Min Breakdown Voltage=28.9V, Min Operating Temperature=-65°C, Operating Supply Voltage=26V, Peak Pulse Power=1.5kW, Power Line Protection=No, Supplier Part Number 1=SMCJ26CALFCT-ND, Test Current=1mA, Category="TVS Diodes", China RoHS=Non-Compliant, ComponentLink1Description=https://datasheet.octopart.com:443/SMCJ26CA-Littelfuse-datasheet-150463582.pdf?src-supplier=Newark, ComponentLink1URL=https://datasheet.octopart.com:443/SMCJ26CA-Littelfuse-datasheet-150463582.pdf?src-supplier=Newark, ComponentLink2Description=https://datasheet.octopart.com:443/SMCJ26CA-Littelfuse-datasheet-65933527.pdf?src-supplier=element14+APAC, ComponentLink2URL=https://datasheet.octopart.com:443/SMCJ26CA-Littelfuse-datasheet-65933527.pdf?src-supplier=element14+APAC, ComponentLink3Description=https://datasheet.octopart.com:443/SMCJ26CA-Littelfuse-datasheet-10669596.pdf?src-supplier=Farnell, ComponentLink3URL=https://datasheet.octopart.com:443/SMCJ26CA-Littelfuse-datasheet-10669596.pdf?src-supplier=Farnell, ComponentLink4Description=https://datasheet.octopart.com:443/SMCJ26CA-Littelfuse-datasheet-8450502.pdf?src-supplier=Farnell, ComponentLink4URL=https://datasheet.octopart.com:443/SMCJ26CA-Littelfuse-datasheet-8450502.pdf?src-supplier=Farnell, ComponentLink5Description=https://datasheet.octopart.com:443/SMCJ26CA-Littelfuse-datasheet-5314397.pdf?src-supplier=Farnell, ComponentLink5URL=https://datasheet.octopart.com:443/SMCJ26CA-Littelfuse-datasheet-5314397.pdf?src-supplier=Farnell, ComponentLink6Description=https://datasheet.octopart.com:443/SMCJ26CA-Littelfuse-datasheet-530249.pdf?src-supplier=Farnell, ComponentLink6URL=https://datasheet.octopart.com:443/SMCJ26CA-Littelfuse-datasheet-530249.pdf?src-supplier=Farnell, ComponentLink7Description=https://datasheet.octopart.com:443/SMCJ26CA-Littelfuse-datasheet-24577164.pdf?src-supplier=Fuses+Unlimited, ComponentLink7URL=https://datasheet.octopart.com:443/SMCJ26CA-Littelfuse-datasheet-24577164.pdf?src-supplier=Fuses+Unlimited, ComponentLink8Description=https://datasheet.octopart.com:443/SMCJ26CA-Littelfuse-datasheet-1147.pdf?src-supplier=DigiKey, ComponentLink8URL=https://datasheet.octopart.com:443/SMCJ26CA-Littelfuse-datasheet-1147.pdf?src-supplier=DigiKey, Composition=Zener, Country of Origin="Mainland China, Philippines", Direction=Bidirectional, Export Control Classification Number (ECCN) Code=EAR99, Harmonized Tariff Schedule (HTS) Code=8541.10.00.50, Height=2.62mm, Introduction Date=2003-11-20, Lead Free="Lead Free", Length=8.13mm, Lifecycle Status=Production, Manufacturer Part Number=SMCJ26CA, Max Reverse Leakage Current=1µA, Mount="Surface Mount", Number of Bidirectional Channels=1, Number of Channels=1, Number of Elements=1, Number of Pins=2, Number of Terminals=2, Packaging="Cut Tape", Peak Pulse Current=35.7A, Peak Reverse Current=1µA, Polarity=Bidirectional, Power Dissipation=1.5kW, Power Rating=1.5kW, Pricing 1="1=0.97, 10=0.603, 100=0.3916, 500=0.30046, 1000=0.27108 (USD)", Radiation Hardening=No, REACH SVHC=No, Reverse Breakdown Voltage=28.9V, Reverse Standoff Voltage=26V, Reverse Voltage=26V, RoHS=Compliant, Schedule B="8541100080, 8541100080|8541100080|8541100080|8541100080|8541100080", Stock 1=33241, Supplier 1=DigiKey, Termination=SMD/SMT, Voltage Rating (DC)=26V, Width=6.22mm
J1: "Socket; DC supply; XT30; male; PIN: 2; on PCBs; THT; Colour: yellow", Package=None, Check_prices=https://www.snapeda.com/parts/XT30PW-M/AMASS/view-part/?ref=eda, MF=AMASS, MP=XT30UPB-M, SnapEDA_Link=https://www.snapeda.com/parts/XT30PW-M/AMASS/view-part/?ref=snap
P1: library part 20021121-00006C4LF, "Pin Header, Vertical, Board-to-Board, 1.27 mm, 2 Rows, 6 Contacts, Surface Mount Straight", Color=Black, Contact Resistance=30mΩ, Current Rating=1A, Dielectric Material=Polyethylene, Insulation Resistance=100MΩ, Manufacturer="Amphenol Communications Solutions", Max Operating Temperature=105°C, Max Voltage Rating (AC)=125V, Min Operating Temperature=-40°C, Operating Force=2.1406N, Supplier Part Number 1=609-3693-1-ND, Category="Headers and Wire Housings", China RoHS=Compliant, ComponentLink1Description=https://datasheet.octopart.com:443/20021121-00006C4LF-Amphenol-Communications-Solutions-datasheet-102830508.pdf?src-supplier=Electro+Sonic, ComponentLink1URL=https://datasheet.octopart.com:443/20021121-00006C4LF-Amphenol-Communications-Solutions-datasheet-102830508.pdf?src-supplier=Electro+Sonic, ComponentLink2Description=https://datasheet.octopart.com:443/20021121-00006C4LF-Amphenol-Communications-Solutions-datasheet-21379658.pdf?src-supplier=Farnell, ComponentLink2URL=https://datasheet.octopart.com:443/20021121-00006C4LF-Amphenol-Communications-Solutions-datasheet-21379658.pdf?src-supplier=Farnell, ComponentLink3Description=https://datasheet.octopart.com:443/20021121-00006C4LF-Amphenol-Communications-Solutions-datasheet-62305862.pdf?src-supplier=Farnell, ComponentLink3URL=https://datasheet.octopart.com:443/20021121-00006C4LF-Amphenol-Communications-Solutions-datasheet-62305862.pdf?src-supplier=Farnell, ComponentLink4Description=https://datasheet.octopart.com:443/20021121-00006C4LF-FCI-datasheet-17852665.pdf?src-supplier=Farnell, ComponentLink4URL=https://datasheet.octopart.com:443/20021121-00006C4LF-FCI-datasheet-17852665.pdf?src-supplier=Farnell, ComponentLink5Description=https://datasheet.octopart.com:443/20021121-00006C4LF-Amphenol-Communications-Solutions-datasheet-98396828.pdf?src-supplier=element14+APAC, ComponentLink5URL=https://datasheet.octopart.com:443/20021121-00006C4LF-Amphenol-Communications-Solutions-datasheet-98396828.pdf?src-supplier=element14+APAC, ComponentLink6Description=https://datasheet.octopart.com:443/20021121-00006C4LF-FCI-datasheet-8699946.pdf?src-supplier=element14+APAC, ComponentLink6URL=https://datasheet.octopart.com:443/20021121-00006C4LF-FCI-datasheet-8699946.pdf?src-supplier=element14+APAC, ComponentLink7Description=https://datasheet.octopart.com:443/20021121-00006C4LF-FCI-datasheet-8640585.pdf?src-supplier=element14+APAC, ComponentLink7URL=https://datasheet.octopart.com:443/20021121-00006C4LF-FCI-datasheet-8640585.pdf?src-supplier=element14+APAC, ComponentLink8Description=https://datasheet.octopart.com:443/20021121-00006C4LF-FCI-datasheet-13726100.pdf?src-supplier=_legacy+Avnet, ComponentLink8URL=https://datasheet.octopart.com:443/20021121-00006C4LF-FCI-datasheet-13726100.pdf?src-supplier=_legacy+Avnet, ComponentLink9Description=https://datasheet.octopart.com:443/20021121-00006C4LF-FCI-datasheet-11547764.pdf?src-supplier=Arrow+Electronics, ComponentLink9URL=https://datasheet.octopart.com:443/20021121-00006C4LF-FCI-datasheet-11547764.pdf?src-supplier=Arrow+Electronics, Connector Type="Header, Male Pin", Contact Material=Gold, Contact Mating Length=3.048mm, Contact Plating=Gold, Depth=3.4mm, Export Control Classification Number (ECCN) Code=EAR99, Gender=Male, Harmonized Tariff Schedule (HTS) Code=8536.69.40.40, Height=5.05mm, Housing Color=Black, Housing Material=Thermoplastic, Insulation Color=Black, Introduction Date=2010-01-29, Length=3.81mm, Lifecycle Status=Production, Manufacturer Part Number=20021121-00006C4LF, Mating Post Length=3.05mm, Mount="Surface Mount", Number of Contacts=6, Number of Pins=6, Number of Positions=6, Number of Rows=2, Orientation=Straight, Pitch=1.27mm, Plating Thickness=254nm, Pricing 1="1=0.64, 10=0.544, 100=0.4618 (USD)", Radiation Hardening=No, REACH SVHC=Yes, RoHS=Compliant, Row Spacing=3.9116mm, Stack Height=3mm, Stock 1=95236, Supplier 1=DigiKey, Terminal Pitch=1.27mm, Termination=Solder, Voltage Rating=125V
P2 P4 P6: library part "3x2.5mm SMD_SOLDER_PAD", "Plated SMD 3x2.5mm SOLDER_PAD"
P3 P5 P7: "Plated SMD 3x2.5mm SOLDER_PAD"
Q1: "60-V, N channel NexFET™ power MOSFET, single SON 3 mm x 3 mm, 9.9 mOhm 8-VSONP -55 to 150", Continuous Drain Current (ID)=12A, Drain to Source Breakdown Voltage=60V, Drain to Source Resistance=8.1mΩ, Gate to Source Voltage (Vgs)=20V, Manufacturer="Texas Instruments", Manufacturer Lifecycle Status=ACTIVE, Max Junction Temperature (Tj)=150°C, Min Operating Temperature=-55°C, Power Dissipation=2.8W, Supplier Part Number 1=296-45302-1-ND, Category=MOSFETs, ComponentLink1Description=https://sigma.octopart.com:443/184372195/technical_drawing/Texas-Instruments-CSD18543Q3AT.pdf?src-supplier=Texas+Instruments, ComponentLink1URL=https://sigma.octopart.com:443/184372195/technical_drawing/Texas-Instruments-CSD18543Q3AT.pdf?src-supplier=Texas+Instruments, ComponentLink2Description=https://octopart.com:443/opatz8j6/c1?t=SsZgKvRmmw05RbnxMb6edfQyltnbhyNkxL9f19K7YcDX2j1foEMjoZPIc1l6vPtWCior1K7MK4Ecl1cKgo7MV1fVyam4EaqiB1Wt0OcocW5rsSx2yHOKWqXc7qV_A0CR85SjtUmhgxtnEX_hM021VMdHmrWiCD7BUQ-eFjN1wT7d3uOjDZQ6HjTgQKaKXek5tndBDP7-u4o-8p4DuqFUS4zP_5tfnTJWQnkrrbk4pzubypwZn_kVBqW1ULvAfegc6D8FFE5u7LfzGe8qoWlBn9GcTR49XIZj8i8BnCmCBkJ1P3eljVqSMcggCW9mefLwr27y7eoW1Wo15o2SxNy6lW0bRjf9UomrOlGTID-rE5uK6cy_FeSS_Sykc-I3kUdFVxsB4BxBI3g&src-supplier=Texas+Instruments, ComponentLink2URL=https://octopart.com:443/opatz8j6/c1?t=SsZgKvRmmw05RbnxMb6edfQyltnbhyNkxL9f19K7YcDX2j1foEMjoZPIc1l6vPtWCior1K7MK4Ecl1cKgo7MV1fVyam4EaqiB1Wt0OcocW5rsSx2yHOKWqXc7qV_A0CR85SjtUmhgxtnEX_hM021VMdHmrWiCD7BUQ-eFjN1wT7d3uOjDZQ6HjTgQKaKXek5tndBDP7-u4o-8p4DuqFUS4zP_5tfnTJWQnkrrbk4pzubypwZn_kVBqW1ULvAfegc6D8FFE5u7LfzGe8qoWlBn9GcTR49XIZj8i8BnCmCBkJ1P3eljVqSMcggCW9mefLwr27y7eoW1Wo15o2SxNy6lW0bRjf9UomrOlGTID-rE5uK6cy_FeSS_Sykc-I3kUdFVxsB4BxBI3g&src-supplier=Texas+Instruments, ComponentLink3Description=https://sigma.octopart.com:443/181443430/technical_drawing/Texas-Instruments-CSD18543Q3AT.pdf?src-supplier=Texas+Instruments, ComponentLink3URL=https://sigma.octopart.com:443/181443430/technical_drawing/Texas-Instruments-CSD18543Q3AT.pdf?src-supplier=Texas+Instruments, ComponentLink4Description=https://datasheet.octopart.com:443/CSD18543Q3AT-Texas-Instruments-datasheet-73765672.pdf?src-supplier=Upverter, ComponentLink4URL=https://datasheet.octopart.com:443/CSD18543Q3AT-Texas-Instruments-datasheet-73765672.pdf?src-supplier=Upverter, ComponentLink5Description=https://datasheet.octopart.com:443/CSD18543Q3AT-Texas-Instruments-datasheet-160724818.pdf?src-supplier=Augswan, ComponentLink5URL=https://datasheet.octopart.com:443/CSD18543Q3AT-Texas-Instruments-datasheet-160724818.pdf?src-supplier=Augswan, ComponentLink6Description=http://sigma.octopart.com:80/reach_statement/Texas-Instruments-company-64.pdf?src-supplier=Compliance+Statements, ComponentLink6URL=http://sigma.octopart.com:80/reach_statement/Texas-Instruments-company-64.pdf?src-supplier=Compliance+Statements, ComponentLink7Description=http://sigma.octopart.com:80/conflict_mineral_statement/Texas-Instruments-company-63.pdf?src-supplier=Compliance+Statements, ComponentLink7URL=http://sigma.octopart.com:80/conflict_mineral_statement/Texas-Instruments-company-63.pdf?src-supplier=Compliance+Statements, Drain to Source Voltage (Vdss)=60V, Element Configuration=Single, Height=900µm, Length=3.3mm, Lifecycle Status=Production, Manufacturer Part Number=CSD18543Q3AT, Max Operating Temperature=150°C, Number of Channels=1, Number of Pins=8, Pricing 1="1=2.29, 10=1.462, 100=0.9912 (USD)", RoHS=Compliant, Schedule B="8541290080, 8541290080|8541290080, 8541290080|8541290080|8541290080|8541290080|8541290080", Stock 1=4526, Supplier 1=DigiKey, Thickness=800µm, Turn-Off Delay Time=8ns, Turn-On Delay Time=9ns, Width=3.3mm
R1 R3 R8: library part CRM2512-JW-1R0ELF, "2W Thick Film Resistors ±200ppm/℃ ±5% 1Ω 2512 Chip Resistor - Surface Mount ROHS", Case Code (Imperial)=2512, Case Code (Metric)=6432, Manufacturer=Bourns, Max Operating Temperature=155°C, Max Power Dissipation=2W, Min Operating Temperature=-55°C, Supplier Part Number 1=CRM2512-JW-1R0ELFCT-ND, Temperature Coefficient=200ppm/°C, Tolerance=±5%, Voltage Rating=600V, Working Voltage=300V, Case/Package=2512, Category="Chip SMD Resistors", China RoHS=Non-Compliant, ComponentLink1Description=https://datasheet.octopart.com:443/CRM2512-JW-1R0ELF-Bourns-datasheet-170520297.pdf?src-supplier=IHS, ComponentLink1URL=https://datasheet.octopart.com:443/CRM2512-JW-1R0ELF-Bourns-datasheet-170520297.pdf?src-supplier=IHS, ComponentLink2Description=https://datasheet.octopart.com:443/CRM2512-JW-1R0ELF-Bourns-datasheet-47549200.pdf?src-supplier=Burklin+Elektronik, ComponentLink2URL=https://datasheet.octopart.com:443/CRM2512-JW-1R0ELF-Bourns-datasheet-47549200.pdf?src-supplier=Burklin+Elektronik, ComponentLink3Description=https://datasheet.octopart.com:443/CRM2512-JW-1R0ELF-Bourns-datasheet-164353756.pdf?src-supplier=JRH+Electronics, ComponentLink3URL=https://datasheet.octopart.com:443/CRM2512-JW-1R0ELF-Bourns-datasheet-164353756.pdf?src-supplier=JRH+Electronics, ComponentLink4Description=https://datasheet.octopart.com:443/CRM2512-JW-1R0ELF-Bourns-datasheet-156155912.pdf?src-supplier=Newark, ComponentLink4URL=https://datasheet.octopart.com:443/CRM2512-JW-1R0ELF-Bourns-datasheet-156155912.pdf?src-supplier=Newark, ComponentLink5Description=https://datasheet.octopart.com:443/CRM2512-JW-1R0ELF-Bourns-datasheet-10028171.pdf?src-supplier=Newark, ComponentLink5URL=https://datasheet.octopart.com:443/CRM2512-JW-1R0ELF-Bourns-datasheet-10028171.pdf?src-supplier=Newark, ComponentLink6Description=https://datasheet.octopart.com:443/CRM2512-JW-1R0ELF-Bourns-datasheet-14874567.pdf?src-supplier=RS+(Formerly+Allied+Electronics), ComponentLink6URL=https://datasheet.octopart.com:443/CRM2512-JW-1R0ELF-Bourns-datasheet-14874567.pdf?src-supplier=RS+(Formerly+Allied+Electronics), ComponentLink7Description=https://datasheet.octopart.com:443/CRM2512-JW-1R0ELF-Bourns-datasheet-154729672.pdf?src-supplier=Electro+Sonic, ComponentLink7URL=https://datasheet.octopart.com:443/CRM2512-JW-1R0ELF-Bourns-datasheet-154729672.pdf?src-supplier=Electro+Sonic, ComponentLink8Description=https://datasheet.octopart.com:443/CRM2512-JW-1R0ELF-Bourns-datasheet-182141858.pdf?src-supplier=Master+Electronics, ComponentLink8URL=https://datasheet.octopart.com:443/CRM2512-JW-1R0ELF-Bourns-datasheet-182141858.pdf?src-supplier=Master+Electronics, ComponentLink9Description=https://datasheet.octopart.com:443/CRM2512-JW-1R0ELF-Bourns-datasheet-10186184.pdf?src-supplier=element14, ComponentLink9URL=https://datasheet.octopart.com:443/CRM2512-JW-1R0ELF-Bourns-datasheet-10186184.pdf?src-supplier=element14, ComponentLink10Description=https://datasheet.octopart.com:443/CRM2512-JW-1R0ELF-Bourns-datasheet-8556829.pdf?src-supplier=element14, ComponentLink10URL=https://datasheet.octopart.com:443/CRM2512-JW-1R0ELF-Bourns-datasheet-8556829.pdf?src-supplier=element14, ComponentLink11Description=http://sigma.octopart.com:80/conflict_mineral_statement/Bourns-company-36.pdf?src-supplier=Compliance+Statements, ComponentLink11URL=http://sigma.octopart.com:80/conflict_mineral_statement/Bourns-company-36.pdf?src-supplier=Compliance+Statements, Composition="Thick Film", Contact Plating=Tin, Country of Origin=Taiwan, Depth=3.1mm, Export Control Classification Number (ECCN) Code=EAR99, Harmonized Tariff Schedule (HTS) Code=8533.21.00.30, Height=600µm, Introduction Date=2011-02-17, Length=6.3mm, Lifecycle Status=Production, Manufacturer Part Number=CRM2512-JW-1R0ELF, Military Standard=Not, Mount="Surface Mount", Number of Pins=2, Number of Terminals=2, Number of Terminations=2, Packaging="Cut Tape", Power Rating=2W, Pricing 1="1=0.45, 10=0.287, 25=0.2428, 50=0.2156, 100=0.1922, 250=0.1666, 500=0.1506, 1000=0.13697 (USD)", REACH SVHC=Yes, Resistance=1Ω, RoHS=Compliant, Schedule B="8533210045, 8533210045|8533210045, 8533210045|8533210045|8533210045, 8533210045|8533210045|8533210045|8533210045", Stock 1=57195, Supplier 1=DigiKey, Termination=SMD/SMT, Voltage Rating (DC)=600V, Width=3.1mm
R2 R7 R9: library part CR2512-J/-000ELF, "0Ω RES SMD 0 OHM JUMPER 1W 2512 / 0 Ohms Jumper 1W Chip Resistor 2512 (6432 Metric) Thick Film", Case Code (Imperial)=2512, Case Code (Metric)=6332, Manufacturer=Bourns, Max Operating Temperature=155°C, Max Power Dissipation=1W, Min Operating Temperature=-55°C, Supplier Part Number 1=CR2512-J/-000ELFCT-ND, Temperature Coefficient=500ppm/°C, Tolerance=±5%, Voltage Rating=200V, Case/Package=2512, Category="Chip SMD Resistors", China RoHS=Non-Compliant, ComponentLink1Description=https://datasheet.octopart.com:443/CR2512-J--000ELF-Bourns-datasheet-159578630.pdf?src-supplier=IHS, ComponentLink1URL=https://datasheet.octopart.com:443/CR2512-J--000ELF-Bourns-datasheet-159578630.pdf?src-supplier=IHS, ComponentLink2Description=https://datasheet.octopart.com:443/CR2512-J--000ELF-Bourns-datasheet-159777434.pdf?src-supplier=IHS, ComponentLink2URL=https://datasheet.octopart.com:443/CR2512-J--000ELF-Bourns-datasheet-159777434.pdf?src-supplier=IHS, ComponentLink3Description=https://datasheet.octopart.com:443/CR2512-J--000ELF-Bourns-datasheet-38188400.pdf?src-supplier=element14+APAC, ComponentLink3URL=https://datasheet.octopart.com:443/CR2512-J--000ELF-Bourns-datasheet-38188400.pdf?src-supplier=element14+APAC, ComponentLink4Description=https://datasheet.octopart.com:443/CR2512-J--000ELF-Bourns-datasheet-68301993.pdf?src-supplier=Master+Electronics, ComponentLink4URL=https://datasheet.octopart.com:443/CR2512-J--000ELF-Bourns-datasheet-68301993.pdf?src-supplier=Master+Electronics, ComponentLink5Description=https://datasheet.octopart.com:443/CR2512-J--000ELF-Bourns-datasheet-177039333.pdf?src-supplier=Burklin+Elektronik, ComponentLink5URL=https://datasheet.octopart.com:443/CR2512-J--000ELF-Bourns-datasheet-177039333.pdf?src-supplier=Burklin+Elektronik, ComponentLink6Description=http://sigma.octopart.com:80/conflict_mineral_statement/Bourns-company-36.pdf?src-supplier=Compliance+Statements, ComponentLink6URL=http://sigma.octopart.com:80/conflict_mineral_statement/Bourns-company-36.pdf?src-supplier=Compliance+Statements, Composition="Thick Film", Contact Plating=Tin, Depth=3.1mm, Height=600µm, Length=6.3mm, Lifecycle Status=Production, Manufacturer Part Number=CR2512-J/-000ELF, Military Standard=Not, Mount="Surface Mount", Number of Terminals=2, Power Rating=1W, Pricing 1="1=0.11, 10=0.071, 25=0.0592, 50=0.052, 100=0.0458, 250=0.03904, 500=0.03482, 1000=0.03123 (USD)", Radiation Hardening=No, REACH SVHC=Yes, Resistance=0Ω, RoHS=Compliant, Stock 1=67164, Supplier 1=DigiKey, Termination=SMD/SMT, Voltage Rating (DC)=200V, Width=3.2mm